# Altium PCB DAP-PCB-REV-3.2.PcbDoc (part 4 of 5)
Units mm, origin at the board's own origin, x right, y up, seen from the top; angles counter-clockwise.
Board outline 54.75 x 54.75 mm, 6 copper layers (L1 (SIG/PWR), L2 (GND), L3 (SIG), L4 (PWR), L5 (GND), L6 (SIG/PWR)), stack 1.65 mm thick; 308 components, 179 nets, 954 pads, 440 vias.
Unrouted connection lines stored in the file: 7.
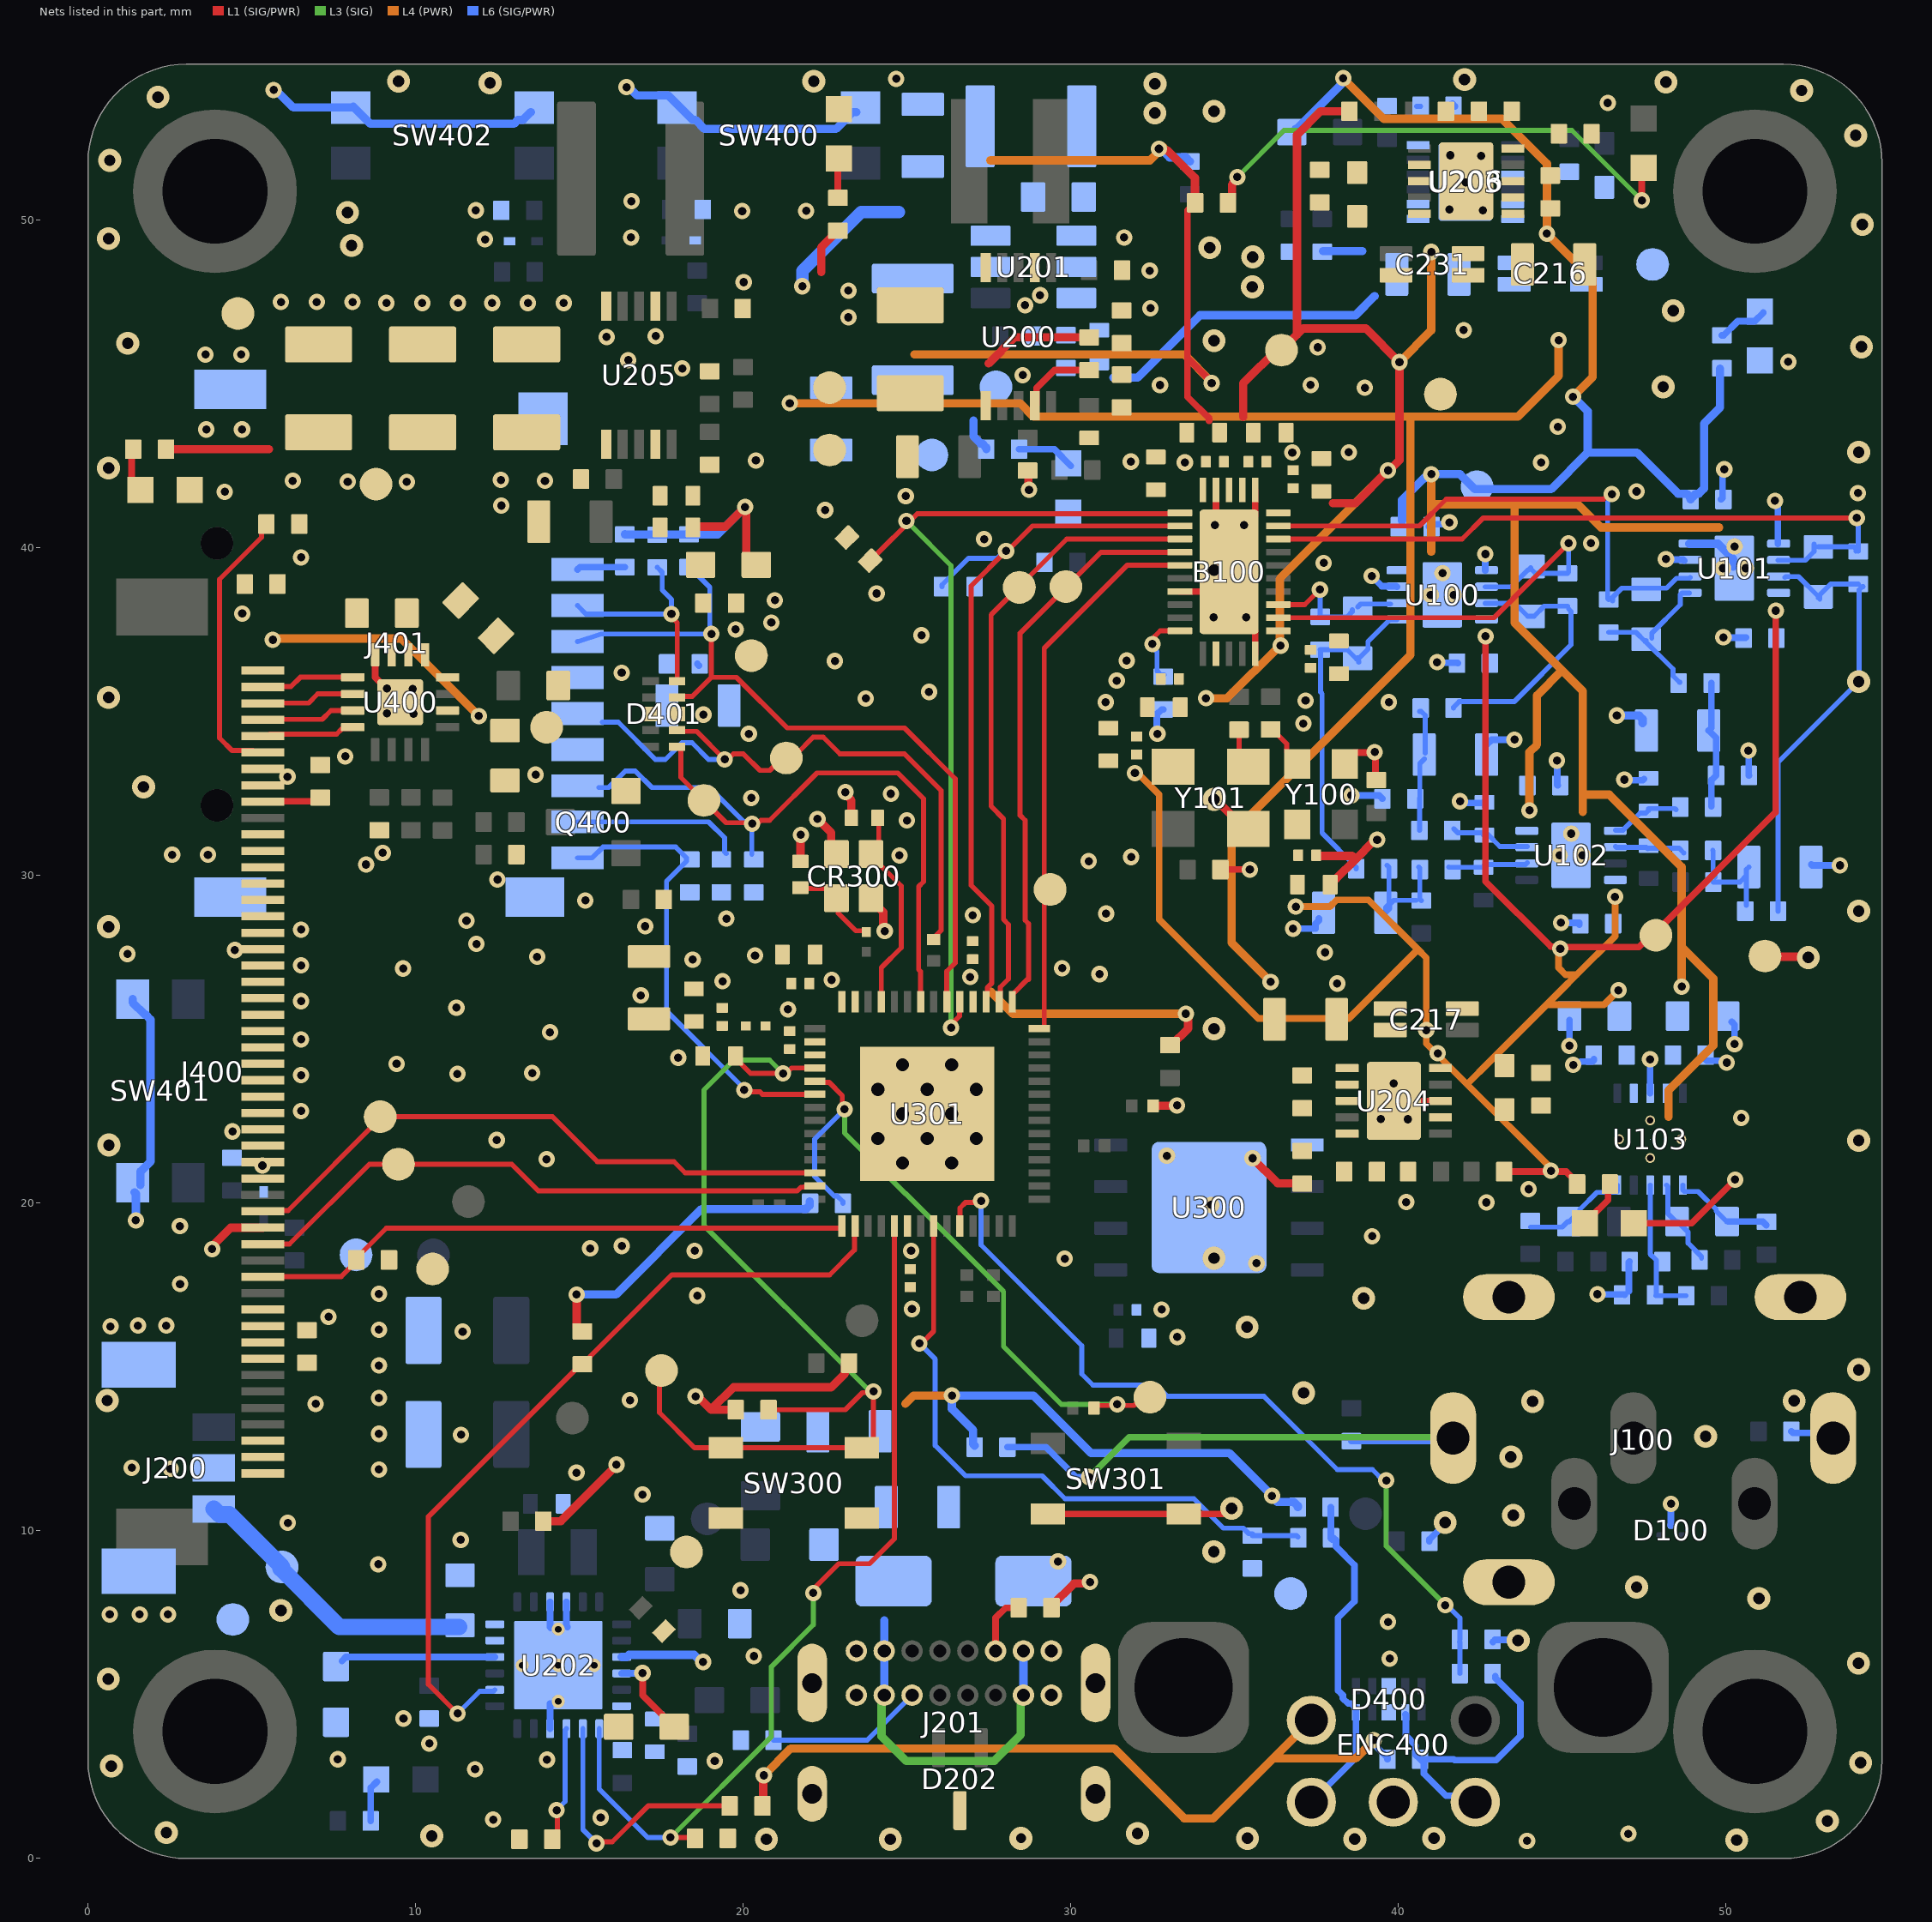
[diagram p6: the nets of this part, all layers, seen from the top]

## Via types
v1: diameter 0.5, hole 0.25, L1 (SIG/PWR) to L6 (SIG/PWR), tented both sides, 357 vias
v2: diameter 0.7, hole 0.35, L1 (SIG/PWR) to L6 (SIG/PWR), tented both sides, 69 vias
v3: diameter 1.25, hole 0.75, L1 (SIG/PWR) to L6 (SIG/PWR), 6 vias
v4: diameter 0.4/0.4/0.4/0.4/0.4/0.4 (per signal layer), hole 0.2, L1 (SIG/PWR) to L6 (SIG/PWR), tented both sides, 5 vias
v5: diameter 0.7, hole 0.3, L1 (SIG/PWR) to L6 (SIG/PWR), tented both sides, 3 vias

## Nets (pads, with @x,y where several pads share a name; then routed paths per layer and width w, separated by ;. In a path a pad name is that pad's centre, name@x,y a point inside that pad or via, vN(x,y) a via of type N, cw(c..) or ccw(c..) an arc to the next point about the centre after c; other vN are vias at no path point) (continued)
GND: B100.11 B100.14 B100.22 B100.30 B100.31 C102.1 C103.1 C104.1 C105.1 C108.1 C109.1 C110.1 C111.1 C112.1 C113.1 C114.1 C115.1 C116.1 C117.1 C119.1 C120.1 C121.1 C122.1 C125.1 C126.1 C127.1 C128.1 C129.1 C130.1 C131.1 C132.2 C133.1 C134.1 C135.1 C136.1 C137.2 C139.1 C200.1 C202.1 C203.1 C204.1 C206.1 C208.1 C209.1 C210.1 C211.1 C213.1 C214.1 C215.1 C216.2 C217.2 C218.1 C219.1 C220.1 C221.1 C224.1 C227.1 C228.1 C229.1 C230.1 C231.2 C232.1 C234.1 C300.1 C301.1 C302.1 C303.1 C304.1 C305.1 C306.1 C307.1 C308.2 C309.1 C310.2 C311.1 C312.1 C400.1 C404.1 C405.1 C407.1 C408.1 C409.1 C412.1 C413.1 CR300.2 CR300.4 D100.1 D201.A D202.3 D205.A D206.C D207.C D208.A D209.C D400.3 D400.8 D401.3 D401.8 D402.A D403.A D404.A ENC400.2 J100.1 J100.SH1 J100.SH2 J100.SH3 J200.2 J200.4 J200.5 J201.A1 J201.A12 J201.B1 J201.B12 J201.S1 J201.S2 J201.S3 J201.S4 J400.11 J400.12 J400.13 J400.14 J400.15 J400.16 J400.17 J400.18 J400.19 J400.20 J400.21 J400.22 J400.23 J400.24 J400.25 J400.26 J400.27 J400.28 J400.29 J400.30 J400.31 J400.32 J400.43 J400.48 J400.49 J400.50 J401.6 J401.G1 J401.G2 J401.G3 J401.G4 Q400.2 R106.1 R107.1 R108.1 R111.1 R112.1 R113.1 R126.1 R129.1 R133.1 R135.2 R205.1 R207.1 R212.1 R215.1 R216.1 R217.1 R218.1 R221.1 R224.1 R226.1 R228.1 R229.1 R230.1 R231.1 R234.1 R235.1 R239.1 R240.1 R245.1 R246.1 R247.1 R303.1 R401.1 R402.1 R403.1 R404.1 R406.1 R412.1 R413.1 R422.1 R424.1 R425.1 SW300.1 SW300.2 SW301.3 SW301.4 TP211.1 TP212.1 TP213.1 TP214.1 TP215.1 TP216.1 TP217.1 TP218.1 TP219.1 TP220.1 TP221.1 TP222.1 U100.3 U100.5 U101.3 U101.5 U103.3 U200.2 U200.5 U201.2 U202.4 U202.15 U202.16 U202.25 U203.9 U203.13 U204.8 U204.11 U205.2 U205.5 U206.8 U206.11 U300.4 U300.9 U301.57 U400.12 U400.17 Y100.2 Y101.2 | length 62.4
  L1 (SIG/PWR) w0.203: U400.12@8.767,36.732 8.767,36.047 9.148,35.666 U400.17@9.148,35.64 ; SW300.1@23.618,10.384 SW300.1@23.818,10.384 ; C307.1@25.099,17.392 C307.1@25.104,17.396 ; SW301.3@29.298,10.511 35.005,10.511 v2@35.005,10.723 ; B100.22@33.329,38.663 34.229,38.663 ccw(c34.229,39.263) B100.31@34.829,39.263 ; v2(34.37,32.319) v2@34.413,32.319 ; v1(34.396,40.695) 34.429,40.728 B100.14@34.429,41.763 ; R107.1@34.565,30.179 34.566,30.18 35.54,30.18 v1@35.541,30.181 ; Y101.2@35.318,31.414 Y101.2@35.418,31.414 Y101.2@35.541,31.292 ; B100.31@35.564,40.974 35.629,40.974 B100.11@35.629,41.763 ; B100.31@35.594,37.494 35.623,37.465 35.623,37.351 35.629,37.346 B100.30@35.629,36.763 ; v1(37.164,35.335) v1(37.164,35.335) ; Y100.2@38.36,33.401 38.36,33.451 38.659,33.749 39.261,33.749 v1(39.274,33.762) 39.299,33.738 39.299,32.931 R106.1@39.323,32.906 ; U204.11@39.907,23.143 39.933,23.118 U204.8@41.282,23.118 ; D207.C@47.185,19.384 48.943,19.384 50.239,20.68 v1@50.271,20.68
  L1 (SIG/PWR) w0.254: C308.2@21.746,30.427 v1@21.746,31.17 ; v1(22.266,31.723) 22.686,31.302 22.686,30.812 CR300.2@22.847,30.651 ; v1(23.118,32.541) 23.118,32.475 23.302,32.291 C310.2@23.302,31.754 ; CR300.4@23.897,29.301 23.897,29.251 24.271,28.877 24.271,28.391 v1@24.286,28.376 ; v1(28.723,41.765) 28.702,41.786 28.702,42.316 C213.1@28.731,42.346 ; R235.1@29.409,7.649 29.409,7.699 30.1,8.39 30.539,8.39 v1(30.586,8.437) ; R303.1@32.511,22.966 32.519,22.974 33.21,22.974 v1@33.253,23.016 ; v2@34.413,32.319 Y101.2@35.318,31.414 ; v1(35.547,21.368) 36.312,20.603 R231.1@37.037,20.603 ; C103.1@37.507,30.594 38.587,30.594 38.688,30.492 ; C102.1@37.918,29.722 37.918,29.797 38.016,29.895 38.091,29.895 38.688,30.492 ; v1@39.35,31.041 39.237,31.041 38.688,30.492 ; TP216.1@51.312,27.538 51.334,27.516 52.483,27.516 v2(52.505,27.494)
  L6 (SIG/PWR) w0.203: U202.4@14.105,3.962 14.105,4.728 U202.25@14.126,4.728 ; U202.15@14.105,7.832 14.105,7.061 U202.25@14.126,7.04 ; U202.16@14.605,7.832 14.605,7.095 U202.25@14.634,7.065 ; C408.1@18.598,36.453 C408.1@18.649,36.402 ; v1@32.622,34.272 32.622,34.916 32.771,35.064 R135.2@32.821,35.064 ; v1(36.783,28.376) 37.464,28.376 37.464,28.517 37.571,28.623 C130.1@37.571,28.681 ; v1@37.342,45.013 37.448,44.907 v1@37.457,44.907 ; v1(38.561,32.44) 39.407,32.44 R133.1@39.509,32.338 ; v1@38.942,44.835 v1@38.974,44.867 ; v1(39.18,39.137) 39.49,38.827 39.925,38.827 U100.3@39.949,38.804 ; v1@39.298,33.659 v1@39.298,33.71 ; C108.1@40.932,40.641 41.006,40.714 41.498,40.714 v1(41.554,40.771) ; R412.1@40.941,9.681 40.941,9.731 41.381,10.171 v2@41.381,10.215 ; v1(41.177,36.504) 41.192,36.489 41.801,36.489 C109.1@41.812,36.478 ; R230.1@41.643,53.547 R230.1@41.724,53.466 ; v1(41.878,32.262) 41.932,32.208 42.571,32.208 C137.2@42.625,32.154 ; U100.5@42.649,39.304 42.65,39.305 42.65,39.805 v1(42.651,39.806) ; C136.1@42.696,33.995 42.843,34.142 v1(43.54,34.142) ; C405.1@42.879,6.608 42.94,6.669 43.637,6.669 v2(43.652,6.654) ; v1(44.835,33.507) 44.848,33.494 44.848,32.757 C125.1@44.86,32.745 ; v1(44.962,28.554) 45.518,28.554 45.521,28.551 C126.1@45.521,28.503 ; v1(45.217,24.801) C129.1@45.217,25.588 ; v1(45.331,24.217) 45.46,24.217 45.56,24.316 45.925,24.316 45.966,24.358 C128.1@45.966,24.394 ; v1@46.098,17.251 46.139,17.21 46.889,17.21 C133.1@46.899,17.2 ; v1(46.892,32.922) 46.908,32.906 47.455,32.906 C132.2@47.493,32.944 ; C133.1@47.03,17.312 47.03,18.193 R108.1@47.053,18.216 ; U103.3@47.681,23.35 v1@47.681,24.387 ; v1(48.162,39.653) 48.18,39.636 48.688,39.636 U101.3@48.721,39.603 ; D100.1@48.315,10.162 v1(48.315,10.824) ; C134.1@49.299,24.515 49.299,24.454 49.41,24.343 49.96,24.343 v1(50.017,24.286) ; C110.1@49.842,41.473 49.892,41.522 49.892,42.272 v1@50.017,42.397 ; v1(49.915,37.266) 49.928,37.253 50.594,37.253 C111.1@50.604,37.263 ; C135.1@50.17,25.531 50.256,25.444 v1(50.256,24.854) ; v1(50.677,33.811) 50.686,33.803 50.686,33.058 R126.1@50.694,33.049 ; v1(51.49,41.431) 51.49,41.351 51.577,41.264 U101.5@51.577,40.118 ; R129.1@51.99,13.034 52.04,12.984 53.115,12.984 J100.1@53.268,12.831 ; C127.1@52.598,30.332 52.624,30.306 v1(53.471,30.306)
  L6 (SIG/PWR) w0.254: v1(46.664,34.878) 47.345,34.878 47.451,34.772 C131.1@47.451,34.65
  other v1: 43.922,0.536 47.013,0.754 12.367,1.187 15.65,1.249 11.815,2.722 19.13,2.976 14.011,3.015 7.624,3.027 10.418,3.509 9.631,4.271 39.73,6.1 20.325,6.175 39.679,7.218 0.665,7.445 1.579,7.446 2.442,7.446 19.918,8.183 8.862,8.977 29.605,9.062 11.378,9.726 6.1,10.24 16.924,11.104 14.911,11.774 8.883,11.868 2.52,11.89 1.336,11.922 11.385,12.93 8.883,12.961 6.953,13.874 16.541,13.986 8.883,14.053 8.883,15.043 33.247,15.914 11.436,16.08 8.883,16.136 0.691,16.233 1.528,16.26 2.392,16.26 32.768,16.752 25.15,16.768 18.597,17.174 46.074,17.22 8.883,17.228 2.812,17.532 35.666,18.165 29.81,18.302 18.521,18.546 15.33,18.615 16.295,18.691 39.196,18.987 2.806,19.297 34.277,19.946 40.238,20.029 42.683,20.02 43.971,20.426 50.275,20.716 5.325,21.145 13.999,21.34 32.931,21.444 12.475,21.924 4.411,22.186 39.455,22.564 40.288,22.559 50.463,22.603 6.506,22.81 33.24,22.982 39.857,23.651 6.506,23.902 11.275,23.945 13.561,23.97 9.421,24.249 47.68,24.388 18.016,24.435 6.506,24.994 14.102,25.213 21.365,25.912 11.245,25.966 6.506,26.163 38.129,26.7 19.37,26.77 30.877,26.989 9.62,27.16 29.734,27.167 6.506,27.255 18.456,27.43 13.709,27.515 20.361,27.557 1.205,27.603 37.754,27.649 4.486,27.721 11.856,27.907 24.318,28.3 6.506,28.347 17.01,28.448 11.554,28.618 27.006,28.784 31.077,28.834 15.181,29.236 12.501,29.874 35.462,30.179 8.488,30.332 30.544,30.434 31.839,30.561 2.57,30.63 3.663,30.63 24.769,30.611 8.996,30.687 39.35,31.088 21.758,31.24 24.998,31.678 20.248,32.364 24.508,32.491 13.665,33.075 7.853,33.634 20.172,34.319 32.643,34.319 37.094,34.634 18.783,34.905 9.127,34.944 9.935,34.929 31.064,35.285 39.704,35.285 23.739,35.397 25.67,35.601 9.127,35.706 9.91,35.691 31.398,35.945 22.8,36.54 31.704,36.554 25.441,37.328 19.77,37.507 20.858,37.717 34.355,37.874 35.346,37.874 4.71,37.99 20.966,38.395 24.072,38.602 37.717,39.533 6.506,39.704 45.876,40.136 27.351,40.26 35.285,40.695 22.501,41.148 12.617,41.286 24.96,41.575 54.023,41.667 4.176,41.707 47.267,41.718 13.949,42.041 12.602,42.066 49.941,42.391 33.481,42.6 44.352,42.6 31.832,42.627 20.387,42.662 36.758,42.905 38.484,42.91 3.612,43.609 4.704,43.609 44.86,43.692 38.974,44.879 32.721,44.963 37.319,44.964 28.528,45.267 18.14,45.47 51.896,45.673 16.489,45.724 3.586,45.895 4.679,45.895 37.532,46.114 15.829,46.43 17.328,46.455 41.99,46.638 23.211,47.03 32.431,47.31 28.604,47.4 9.11,47.469 10.202,47.469 11.295,47.469 12.336,47.469 13.428,47.469 14.52,47.469 5.89,47.496 6.982,47.496 8.074,47.496 29.062,47.705 23.211,47.843 20.015,48.103 32.406,48.453 12.12,49.407 16.577,49.466 31.625,49.469 19.968,50.271 21.922,50.276 11.84,50.296 42.573,50.301 41.557,50.326 16.59,50.575 42.05,51.144 42.522,51.952 41.582,51.977 46.384,53.573 24.667,54.309
  other v2: 50.322,0.562 20.706,0.587 24.49,0.588 38.666,0.59 35.389,0.615 41.079,0.615 10.495,0.689 32.033,0.766 2.393,0.79 53.091,1.146 0.716,2.822 54.107,2.924 0.623,5.477 54.039,5.959 5.889,7.571 50.999,7.936 47.266,8.282 34.363,9.364 41.423,10.248 43.506,10.476 34.903,10.684 43.429,12.254 49.374,12.88 44.091,13.946 52.077,13.963 0.588,13.974 37.105,14.21 54.045,14.914 35.378,16.217 38.935,17.096 34.37,18.319 0.639,21.772 54.045,21.914 34.37,25.319 0.629,28.431 54.045,28.914 1.697,32.701 0.629,35.431 34.37,39.319 0.629,42.431 54.045,42.914 48.076,44.909 54.132,46.129 1.215,46.24 34.37,46.319 48.382,47.23 35.539,47.959 35.552,48.873 34.238,49.154 8.045,49.22 0.629,49.431 54.157,49.864 7.92,50.227 0.665,51.819 53.955,52.581 32.567,53.268 34.37,53.319 2.139,53.749 52.304,53.952 32.568,54.156 12.273,54.181 48.163,54.206 9.479,54.232 22.154,54.232 42.016,54.284
  other v4: 14.355,4.797 13.255,5.897 14.355,5.897 15.455,5.897 14.355,6.997
  other v5: 28.477,0.614
GPIO1_DAC: B100.17 R112.2 U301.45 | length 22.3
  L1 (SIG/PWR) w0.152: U301.45@27.413,26.147 27.447,26.18 27.447,26.483 27.449,26.485 27.449,26.577 27.588,26.716 27.588,29.062 26.953,29.697 26.953,38.833 v1(28.022,39.902) ; v1@28.044,39.88 28.826,40.663 33.031,40.663 B100.17@33.049,40.644
  L6 (SIG/PWR) w0.152: R112.2@26.064,38.815 26.064,38.865 26.878,39.679 27.759,39.679 27.982,39.902 v1(28.022,39.902)
GPIO2_DAC: B100.16 R113.2 U301.47 | length 26.7
  L1 (SIG/PWR) w0.152: R113.2@23.878,39.605 25.312,41.039 33.089,41.039 B100.16@33.126,41.076 ; v1(26.344,25.353) 26.344,25.447 26.602,25.705 26.602,26.135 U301.47@26.613,26.147
  L3 (SIG) w0.152: v1@25.074,40.72 25.079,40.72 26.344,39.455 v1(26.344,25.353)
  other v1: 24.981,40.818
ILIM_BQ: R217.2 U202.22 | length 2.7
  L1 (SIG/PWR) w0.203: v1@16.933,5.658 16.933,4.982 17.549,4.366 17.549,4.316 17.847,4.017 R217.2@17.897,4.017
  L6 (SIG/PWR) w0.203: U202.22@16.29,5.647 16.295,5.652 16.919,5.652 v1(16.924,5.658)
ILIM_DAC_LDO+: R246.2 U206.5 | length 0.3
  L1 (SIG/PWR) w0.203: U206.5@43.489,52.209 U206.5@43.491,52.185 ; R246.2@43.489,53.12 R246.2@43.489,53.369
ILIM_LDO+: R229.2 U204.5 | length 0.3
  L1 (SIG/PWR) w0.203: R229.2@38.206,20.825 R229.2@38.206,20.908 ; U204.5@38.432,22.118 38.642,22.118 U204.5@38.665,22.094
ILIM_LDO-: R230.2 U203.6 | length 0.1
  L6 (SIG/PWR) w0.152: R230.2@40.55,53.471 R230.2@40.677,53.471
IM0: J400.6 R402.2 | length 8.3
  L1 (SIG/PWR) w0.152: J400.6@5.084,33.76 5.035,33.809 4.401,33.809 4.017,34.193 4.017,39.037 5.299,40.318 5.299,40.681 R402.2@5.313,40.695
IM3: J400.9 R403.2 | length 1.9
  L1 (SIG/PWR) w0.203: J400.9@5.084,32.26 R403.2@7.025,32.26
INT_BQ: R210.1 U202.8 U301.16 | length 24.9
  L1 (SIG/PWR) w0.152: v1(11.282,4.424) 10.393,5.313 10.393,10.433 15.042,15.082 15.142,15.082 15.315,15.256 15.315,15.306 17.819,17.809 22.635,17.809 23.397,18.571 23.397,19.13 U301.16@23.448,19.181
  L6 (SIG/PWR) w0.152: v1(11.282,4.424) 11.961,5.103 12.376,5.103 U202.8@12.42,5.147
ISET_BQ: R218.2 U202.10 | length 4.7
  L6 (SIG/PWR) w0.203: R218.2@7.751,6.024 7.751,6.026 7.872,6.147 U202.10@12.42,6.147
IV_L: C107.1 R103.2 R116.1 U101.7 | length 13.7
  L6 (SIG/PWR) w0.152: R116.1@51.583,28.909 51.583,33.452 v2(54.045,35.914) ; U101.7@51.795,39.095 51.818,39.118 52.208,39.118 52.814,38.513 C107.1@52.814,38.463 ; C107.1@52.861,38.434 52.861,38.56 53.191,38.89 R103.2@54.033,38.89 ; v2@54.055,35.97 54.055,38.716 54.155,38.815 R103.2@54.182,38.815
IV_LB: C101.1 R101.2 R123.1 U101.1 | length 4.9
  L6 (SIG/PWR) w0.152: R101.2@46.413,37.417 47.25,37.417 C101.1@47.527,37.139 ; C101.1@47.556,37.167 47.556,37.117 48.377,36.296 48.377,36.093 48.576,35.894 R123.1@48.594,35.894 ; C101.1@47.731,37.24 47.731,37.392 48.604,38.265 48.604,38.569 48.653,38.618 U101.1@48.877,38.618
IV_R: C100.1 R100.2 R121.1 U100.1 | length 10.2
  L6 (SIG/PWR) w0.152: R100.2@37.612,36.889 38.431,36.889 C100.1@38.718,36.602 ; R100.2@37.621,36.809 37.621,35.591 37.668,35.544 37.668,31.297 38.71,30.255 R121.1@38.71,30.205 ; C100.1@38.755,36.639 38.755,36.589 39.066,36.9 39.066,37.135 39.675,37.744 39.675,37.755 39.724,37.804 U100.1@39.949,37.804 ; C100.1@38.79,36.504 C100.1@38.79,36.53
IV_RB: C106.1 R102.2 R131.1 U100.7 | length 8.3
  L6 (SIG/PWR) w0.152: R131.1@41.677,35.107 41.677,35.127 41.851,35.301 43.53,35.301 45.267,37.037 45.267,38.053 R102.2@45.191,38.129 ; U100.7@42.649,38.304 43.544,38.304 43.94,37.907 44.136,37.907 44.447,38.218 R102.2@45.156,38.218
JACK_DET: J100.4 R118.1 R119.2 | length 17.8
  L3 (SIG) w0.203: v1(30.56,11.637) 31.779,12.856 J100.4@41.635,12.856
  L6 (SIG/PWR) w0.203: R118.1@28.063,12.552 29.239,12.552 30.154,11.637 v1(30.56,11.637) ; R119.2@38.561,12.737 41.762,12.737 J100.4@41.762,12.602
LDO_BQ: C214.2 R214.2 U202.24
LED1: J400.2 U400.13 | length 3.1
  L1 (SIG/PWR) w0.152: J400.2@5.084,35.76 6.194,35.76 6.481,36.047 U400.13@8.107,36.047
LED2: J400.3 U400.14 | length 3.1
  L1 (SIG/PWR) w0.152: J400.3@5.084,35.26 6.736,35.26 7.014,35.539 U400.14@8.056,35.539
LED3: J400.4 U400.15 | length 3.1
  L1 (SIG/PWR) w0.152: J400.4@5.084,34.76 7.15,34.76 7.421,35.031 U400.15@8.081,35.031
LED4: J400.5 U400.16 | length 2.7
  L1 (SIG/PWR) w0.152: J400.5@5.516,34.269 5.556,34.309 7.588,34.309 7.753,34.474 8.032,34.474 U400.16@8.081,34.523
LEFT_EAR: C138.1 R127.1 U103.7 | length 2.7
  L6 (SIG/PWR) w0.152: U103.7@48.181,20.55 48.225,20.506 48.225,19.676 C138.1@48.466,19.435 ; C138.1@48.516,19.435 48.84,19.111 48.84,18.776 49.249,18.367 R127.1@49.249,18.317
MOSI_LCD: J400.34 TP403.1 U301.12 | length 18.8
  L1 (SIG/PWR) w0.152: J400.34@5.338,19.75 5.361,19.773 6.108,19.773 TP403.1@8.945,22.61 ; TP403.1@8.919,22.635 8.945,22.635 14.177,22.635 15.549,21.264 17.886,21.264 18.228,20.922 U301.12@22.188,20.922
NetC118_2: C118.2 R122.2 U102.2 | length 2.4
  L6 (SIG/PWR) w0.152: R122.2@41.533,30.255 41.54,30.249 C118.2@42.606,30.249 ; C118.2@42.6,30.281 42.652,30.333 43.878,30.333 U102.2@43.927,30.382
NetC123_2: C123.2 R120.2 U102.6 | length 2.1
  L6 (SIG/PWR) w0.152: U102.6@46.627,30.882 46.652,30.858 47.56,30.858 C123.2@47.604,30.814 ; C123.2@47.635,30.833 R120.2@48.55,30.833 ; R120.2@48.561,30.833 R120.2@48.707,30.687
NetC124_2: C124.2 R117.1 U103.10 | length 3.3
  L6 (SIG/PWR) w0.152: R117.1@44.034,19.267 44.996,19.267 45.164,19.435 45.214,19.435 45.538,19.759 45.538,19.809 46.055,20.326 46.637,20.326 46.681,20.37 U103.10@46.681,20.55
NetC127_2: C127.2 R115.1 R116.2 R120.1 | length 3.3
  L6 (SIG/PWR) w0.152: R120.1@49.591,30.763 49.6,30.755 49.6,30.012 R115.1@49.661,29.951 ; R115.1@49.608,29.798 50.418,29.798 50.618,29.998 R116.2@50.618,29.087 ; C127.2@50.692,30.255 C127.2@50.618,30.182 ; C127.2@50.618,30.182 50.618,30.024 C127.2@50.618,30.182
NetC130_2: C130.2 R114.1 R121.2 R122.1 | length 3.9
  L6 (SIG/PWR) w0.152: R121.2@39.653,30.306 39.71,30.249 39.71,29.098 39.852,29.239 R114.1@40.542,29.239 ; R122.1@40.619,30.255 40.652,30.222 40.652,29.274 R114.1@40.695,29.231 ; C130.2@39.603,28.855 39.603,29.016 39.736,29.149 39.736,28.988 C130.2@39.603,28.855
NetC131_2: C131.2 R123.2 R124.1 R126.2 | length 3.9
  L6 (SIG/PWR) w0.203: R123.2@49.551,35.869 49.551,34.504 C131.2@49.468,34.421 49.694,34.195 R126.2@49.694,33.049 49.553,32.908 R124.1@49.553,32.11
NetC132_1: C132.1 R124.2 U102.5 | length 2.1
  L6 (SIG/PWR) w0.152: U102.5@46.627,31.382 46.852,31.382 47.373,31.904 47.55,31.904 C132.1@47.629,31.983 ; C132.1@47.63,32.04 48.435,32.04 R124.2@48.467,32.008
NetC133_2: C133.2 R108.2 R128.2 U103.8 | length 4.4
  L6 (SIG/PWR) w0.152: U103.8@47.681,20.55 47.681,18.446 47.872,18.255 47.872,17.189 47.858,17.174 R128.2@48.78,17.174
NetC136_2: C136.2 R131.2 R132.1 R133.2 | length 3.6
  L6 (SIG/PWR) w0.152: R132.1@40.638,31.373 40.645,31.38 R133.2@40.645,32.363 ; R131.2@40.644,35.005 40.689,35.005 40.812,34.883 C136.2@40.812,33.735 ; R133.2@40.652,32.338 40.652,33.413 C136.2@40.796,33.557
NetC137_1: C137.1 R132.2 U102.3 | length 2.4
  L6 (SIG/PWR) w0.152: R132.2@41.685,31.424 41.806,31.304 C137.1@42.585,31.304 ; C137.1@42.585,31.246 42.731,31.246 43.094,30.882 U102.3@43.927,30.882
NetC138_2: C138.2 R134.1 U103.6 | length 3.1
  L6 (SIG/PWR) w0.152: U103.6@48.681,20.55 48.681,20.4 48.725,20.356 49.146,20.356 49.692,19.809 49.692,19.759 50.016,19.435 C138.2@50.066,19.435
  L6 (SIG/PWR) w0.203: C138.2@50.066,19.435 R134.1@51.087,19.435 ; R134.1@51.113,19.435 R134.1@51.222,19.325
NetC201_1: C201.1 L202.1 U201.5
NetC201_2: C201.2 L201.2 U201.1
NetC205_1: C205.1 R201.1 R204.2 U201.3
NetC212_1: C212.1 R213.1
NetC216_1: C216.1 C222.1 R232.1
NetC217_1: C217.1 C223.2 R233.1
NetC219_2: C219.2 D201.C FB200.1 J201.A4 J201.A9 J201.B4 J201.B9 | length 10.1
  L3 (SIG) w0.254: J201.B4@24.219,4.741 24.219,3.729 24.972,2.976 27.665,2.976 28.469,3.78 J201.B9@28.469,4.741
  L6 (SIG/PWR) w0.254: J201.B4@24.304,4.982 J201.A9@24.304,6.118 ; J201.A9@24.304,6.332 24.304,7.27 ; J201.B9@28.554,4.982 28.554,6.1 J201.A4@28.579,6.125
NetC221_2: C221.2 R227.1
NetC223_1: C223.1 R233.2 U204.7
NetC226_2: C226.2 R238.2
NetC231_1: C231.1 C233.2 R248.1
NetC233_1: C233.1 R248.2 U206.7
NetC302_2: C302.2 L300.1 U301.2 U301.3
NetC404_2: C404.2 R400.2 U301.22 | length 19.3
  L1 (SIG/PWR) w0.152: v1@25.429,15.701 25.813,16.085 U301.22@25.813,19.297
  L6 (SIG/PWR) w0.152: v1(25.376,15.719) 25.861,15.234 25.861,12.602 26.788,11.675 29.125,11.675 29.824,10.977 33.756,10.977 34.653,10.08 35.26,10.08 35.43,9.91 C404.2@35.539,9.91 ; C404.2@35.539,9.851 36.893,9.851 R400.2@36.936,9.808
NetC405_2: C405.2 R408.1 U301.24 | length 25.1
  L1 (SIG/PWR) w0.152: U301.24@26.613,19.297 26.613,19.85 26.78,20.016 27.205,20.016 v1(27.258,20.07)
  L3 (SIG) w0.152: v1(39.628,11.536) 39.628,9.529 v1@41.33,7.827
  L6 (SIG/PWR) w0.152: v1(27.258,20.07) 27.258,18.724 30.332,15.65 30.332,14.787 30.674,14.444 32.605,14.444 32.948,14.101 35.894,14.101 38.129,11.866 39.204,11.866 39.534,11.536 v1(39.628,11.536) ; v1@41.457,7.751 41.871,7.337 C405.2@41.871,6.684 ; C405.2@41.863,6.608 41.871,6.6 R408.1@41.871,5.643
  other v1: 41.427,7.73
NetC410_1: C410.1 U400.8
NetC410_2: C410.2 U400.9
NetC411_1: C411.1 U400.11
NetC411_2: C411.2 U400.10
NetD200_A: D200.A R206.1 | length 1.3
  L6 (SIG/PWR) w0.203: R206.1@8.632,1.147 8.632,2.155 D200.A@8.818,2.341
NetD204_A: D204.A R242.1 | length 15.7
  L1 (SIG/PWR) w0.203: v1(47.426,50.601) 47.426,51.539 D204.A@47.477,51.59
  L1 (SIG/PWR) w0.254: R242.1@34.794,50.525 34.917,50.648 34.917,51.081 35.081,51.245 v1(35.081,51.312)
  L3 (SIG) w0.152: v1(35.081,51.312) 36.504,52.734 45.292,52.734 v1(47.426,50.601)
NetD205_C: D205.C R249.1 | length 1.8
  L6 (SIG/PWR) w0.203: R249.1@28.419,43.006 29.493,43.006 D205.C@30.001,42.498
NetD206_A: D206.A R250.1 | length 1.3
  L1 (SIG/PWR) w0.203: R250.1@22.889,50.677 22.889,51.769 D206.A@23.016,51.896
NetD207_A: D207.A R251.1 | length 1.3
  L1 (SIG/PWR) w0.203: D207.A@45.863,19.562 46.393,20.092 46.393,20.519 R251.1@46.453,20.578
NetD208_C: D208.C R252.1 | length 1.6
  L6 (SIG/PWR) w0.203: R252.1@49.871,46.478 49.921,46.478 50.355,46.912 50.874,46.912 D208.C@51.134,47.172
NetD209_A: D209.A R253.1 | length 1.2
  L1 (SIG/PWR) w0.203: R253.1@1.401,42.854 1.378,42.854 1.332,42.808 1.332,42.034 D209.A@1.604,41.762
NetJ201_A5: J201.A5 R235.2 | length 1.8
  L1 (SIG/PWR) w0.203: J201.A5@27.704,6.332 27.704,7.344 28.009,7.649 R235.2@28.409,7.649
NetJ201_B5: J201.B5 R234.2 | length 4.8
  L6 (SIG/PWR) w0.152: R234.2@20.926,3.611 23.782,3.611 25.052,4.881 J201.B5@25.15,4.881
NetJ401_1: J401.1 R417.1 | length 1.5
  L6 (SIG/PWR) w0.203: J401.1@14.941,39.336 15.012,39.407 R417.1@16.387,39.407
NetJ401_8: J401.8 R418.1 | length 5.2
  L6 (SIG/PWR) w0.152: J401.8@14.941,31.636 18.943,31.636 19.43,31.15 19.43,30.718 R418.1@19.481,30.667

## Text inside footprints (layer, text, board x,y; h text height)
J201: Mechanical 13 "PCB EDGE" at 21.114,0.402 h0.81